# Altium PCB MVP-Module-Dash-v2.0.PcbDoc (part 2 of 6)
Units mil, origin at the board's own origin, x right, y up, seen from the top; angles counter-clockwise.
Board outline 5314.96 x 3937.01 mil, 4 copper layers (Top, GND, PWR, Bottom), stack 60.118 mil thick; 364 components, 288 nets, 1223 pads, 0 vias.
Unrouted connection lines stored in the file: 976.
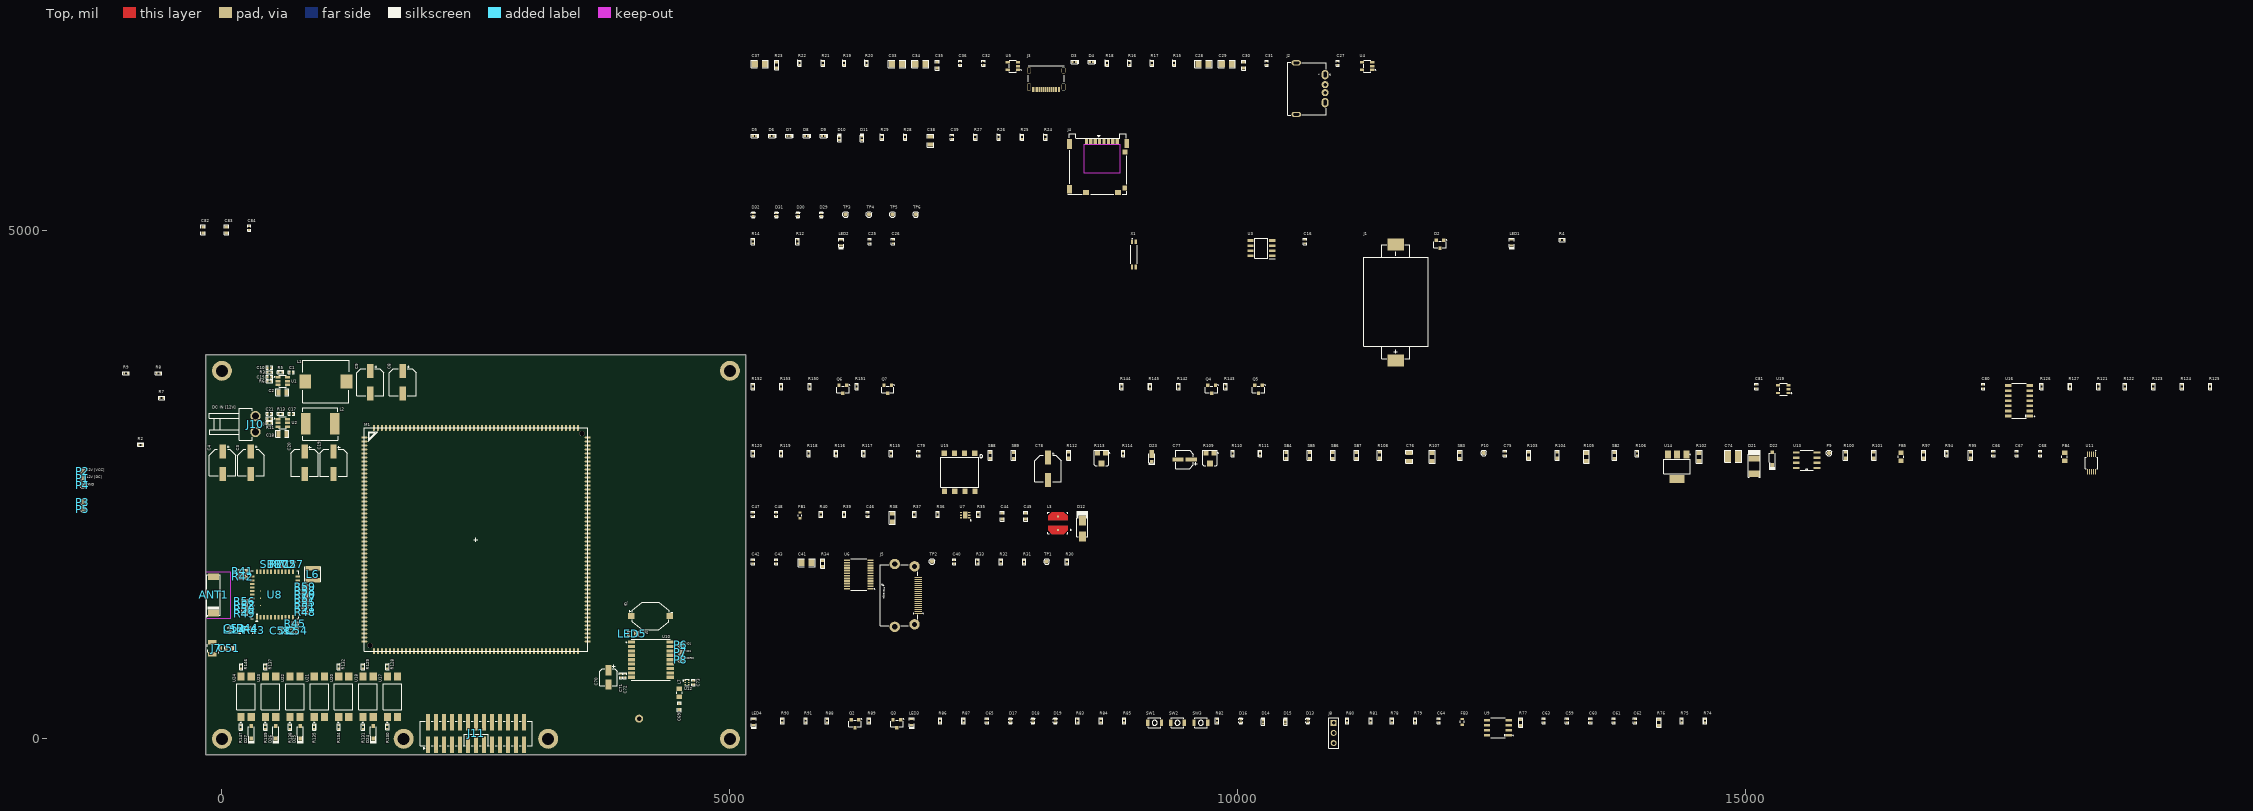
[diagram p0: Top view]

## Part data
ANT1: "RF ANT 2.4GHZ/5.5GHZ CHIP SLD", Case/Package=SMD/SMT, Frequency=5GHz, Manufacturer=Pulse, Max Frequency=5.85GHz, Max Operating Temperature=85°C, Min Frequency=2.4GHz, Min Operating Temperature=-40°C, Package Quantity=1, Category="RF Antennas", ComponentLink1Description=https://datasheet.ciiva.com/2792/+w3006-2792242.pdf?src-supplier=Digi-Key, ComponentLink1URL=https://datasheet.ciiva.com/2792/+w3006-2792242.pdf?src-supplier=Digi-Key, ComponentLink2Description=https://datasheet.ciiva.com/4432/w3006-203400-4432372.pdf?src-supplier=Mouser, ComponentLink2URL=https://datasheet.ciiva.com/4432/w3006-203400-4432372.pdf?src-supplier=Mouser, ComponentLink3Description=https://datasheet.ciiva.com/2792/+w3006-2792243.pdf?src-supplier=Digi-Key, ComponentLink3URL=https://datasheet.ciiva.com/2792/+w3006-2792243.pdf?src-supplier=Digi-Key, ComponentLink4Description=https://datasheet.ciiva.com/2792/+w3006-2792244.pdf?src-supplier=Digi-Key, ComponentLink4URL=https://datasheet.ciiva.com/2792/+w3006-2792244.pdf?src-supplier=Digi-Key, ComponentLink5Description=https://datasheet.ciiva.com/8152/antennas-g00302-8152982.pdf?src-supplier=Avnet, ComponentLink5URL=https://datasheet.ciiva.com/8152/antennas-g00302-8152982.pdf?src-supplier=Avnet, Contact Plating=Tin,Matte, Height=0.059inch, Impedance=50R, Item Type=Antenna, Length=10mm, Manufacturer Part Number=W3006, Mount="Surface Mount", Number of Bands=2, Number of Pins=2, Packaging=Bulk, Pricing 1="1000=1.00560, 2000=0.97680 (USD)", Radiation Hardening=No, Return Loss=-10dB, RoHS=Yes, RoHS Compliant=Yes, Series=-, Stock 1=3000, Supplier 1="Arrow Electronics", Supplier Part Number 1=W3006, Termination=Solder, Width=3.2mm
Ant2: "GPS passive ceramic antenna, size 18*18*", LCSC Part Number=C962215, Manufacturer="Shenzhen Kinghelm Elec", Package=Custom, ComponentLink1Description=LCSC, ComponentLink1URL=https://www.lcsc.com/product-detail/Antennas_Shenzhen-Kinghelm-Elec-KH-GPS181804-WY_C962215.html, Item Type=Antenna, Manufacturer Part Number=KH-GPS181804-WY
C1 C5 C7 C13 C15 C16 C17 C24 C39 C40 C42 C43 C48 C64 C84: library part GRM155R71H104ME14D, "CAP CER 0.1UF 50V X7R 0402", Capacitance=100nF, Case/Package=0402, LCSC Part Number=C182412, Manufacturer=Murata, Max Operating Temperature=125°C, Min Operating Temperature=-55°C, Tolerance=20%, Voltage Rating=50V, Category="Ceramic Capacitors", ComponentLink1Description=http://www.mouser.com/ds/2/281/c02e-2905.pdf?src-supplier=Mouser, ComponentLink1URL=http://www.mouser.com/ds/2/281/c02e-2905.pdf?src-supplier=Mouser, ComponentLink2Description=http://search.murata.co.jp/Ceramy/image/img/A01X/G101/ENG/GRM155R71H104ME14-01.pdf?src-supplier=Digi-Key, ComponentLink2URL=http://search.murata.co.jp/Ceramy/image/img/A01X/G101/ENG/GRM155R71H104ME14-01.pdf?src-supplier=Digi-Key, ComponentLink3Description=http://psearch.en.murata.com/capacitor/product/GRM155R71H104ME14%23.pdf?src-supplier=Avnet, ComponentLink3URL=http://psearch.en.murata.com/capacitor/product/GRM155R71H104ME14%23.pdf?src-supplier=Avnet, Item Type=Capacitor, Length=0.039inch, Manufacturer Part Number=GRM155R71H104ME14D, Mount="Surface Mount", Packaging="Cut Tape", Pricing 1="10000=0.00444, 20000=0.00420, 40000=0.00396, 60000=0.00372, 80000=0.00348, 100000=0.00324, 1000000=0.00300 (USD)", RoHS=Yes, RoHS Compliant=Yes, Stock 1=100000, Supplier 1=Avnet, Supplier Part Number 1=GRM155R71H104ME14D, Thickness=0.022inch, Width=0.02inch
C2 C6 C18 C38: library part GRM21BR61H106ME43L, "CAP CER 10UF 50V X5R 0805", LCSC Part Number=C2190942, Manufacturer=Murata, Supplier Part Number 1=490-18664-1-ND, Category="Ceramic Capacitors", Manufacturer Part Number=GRM21BR61H106ME43L, Pricing 1="1=0.44000, 10=0.30700, 50=0.21500, 100=0.18420, 500=0.13818, 1000=0.11668 (USD)", RoHS=Yes, Stock 1=26, Supplier 1=Digi-Key
C3 C4: library part RVT1H101M0607, "100uF 50V ±20% SMD,D6.3xL7.7mm Aluminum Electrolytic Capacitors - SMD ROHS", LCSC Part Number=C3151829, Manufacturer=ROQANG, Package=SMD,D6.3xL7.7mm, ComponentLink1Description=LCSC, ComponentLink1URL=https://www.lcsc.com/product-detail/Aluminum-Electrolytic-Capacitors-SMD_ROQANG-RVT1H101M0607_C3151829.html, Item Type=Capacitor, Manufacturer Part Number=RVT1H101M0607